# Altium PCB GTV4.0-V16_Lite.PcbDoc (part 5 of 7)
Units mil, origin at the board's own origin, x right, y up, seen from the top; angles counter-clockwise.
Board outline 5582.68 x 4389.76 mil, 4 copper layers (Top Layer, Layer 1, Layer 2, Bottom Layer), stack 62.631 mil thick; 269 components, 191 nets, 849 pads, 375 vias.
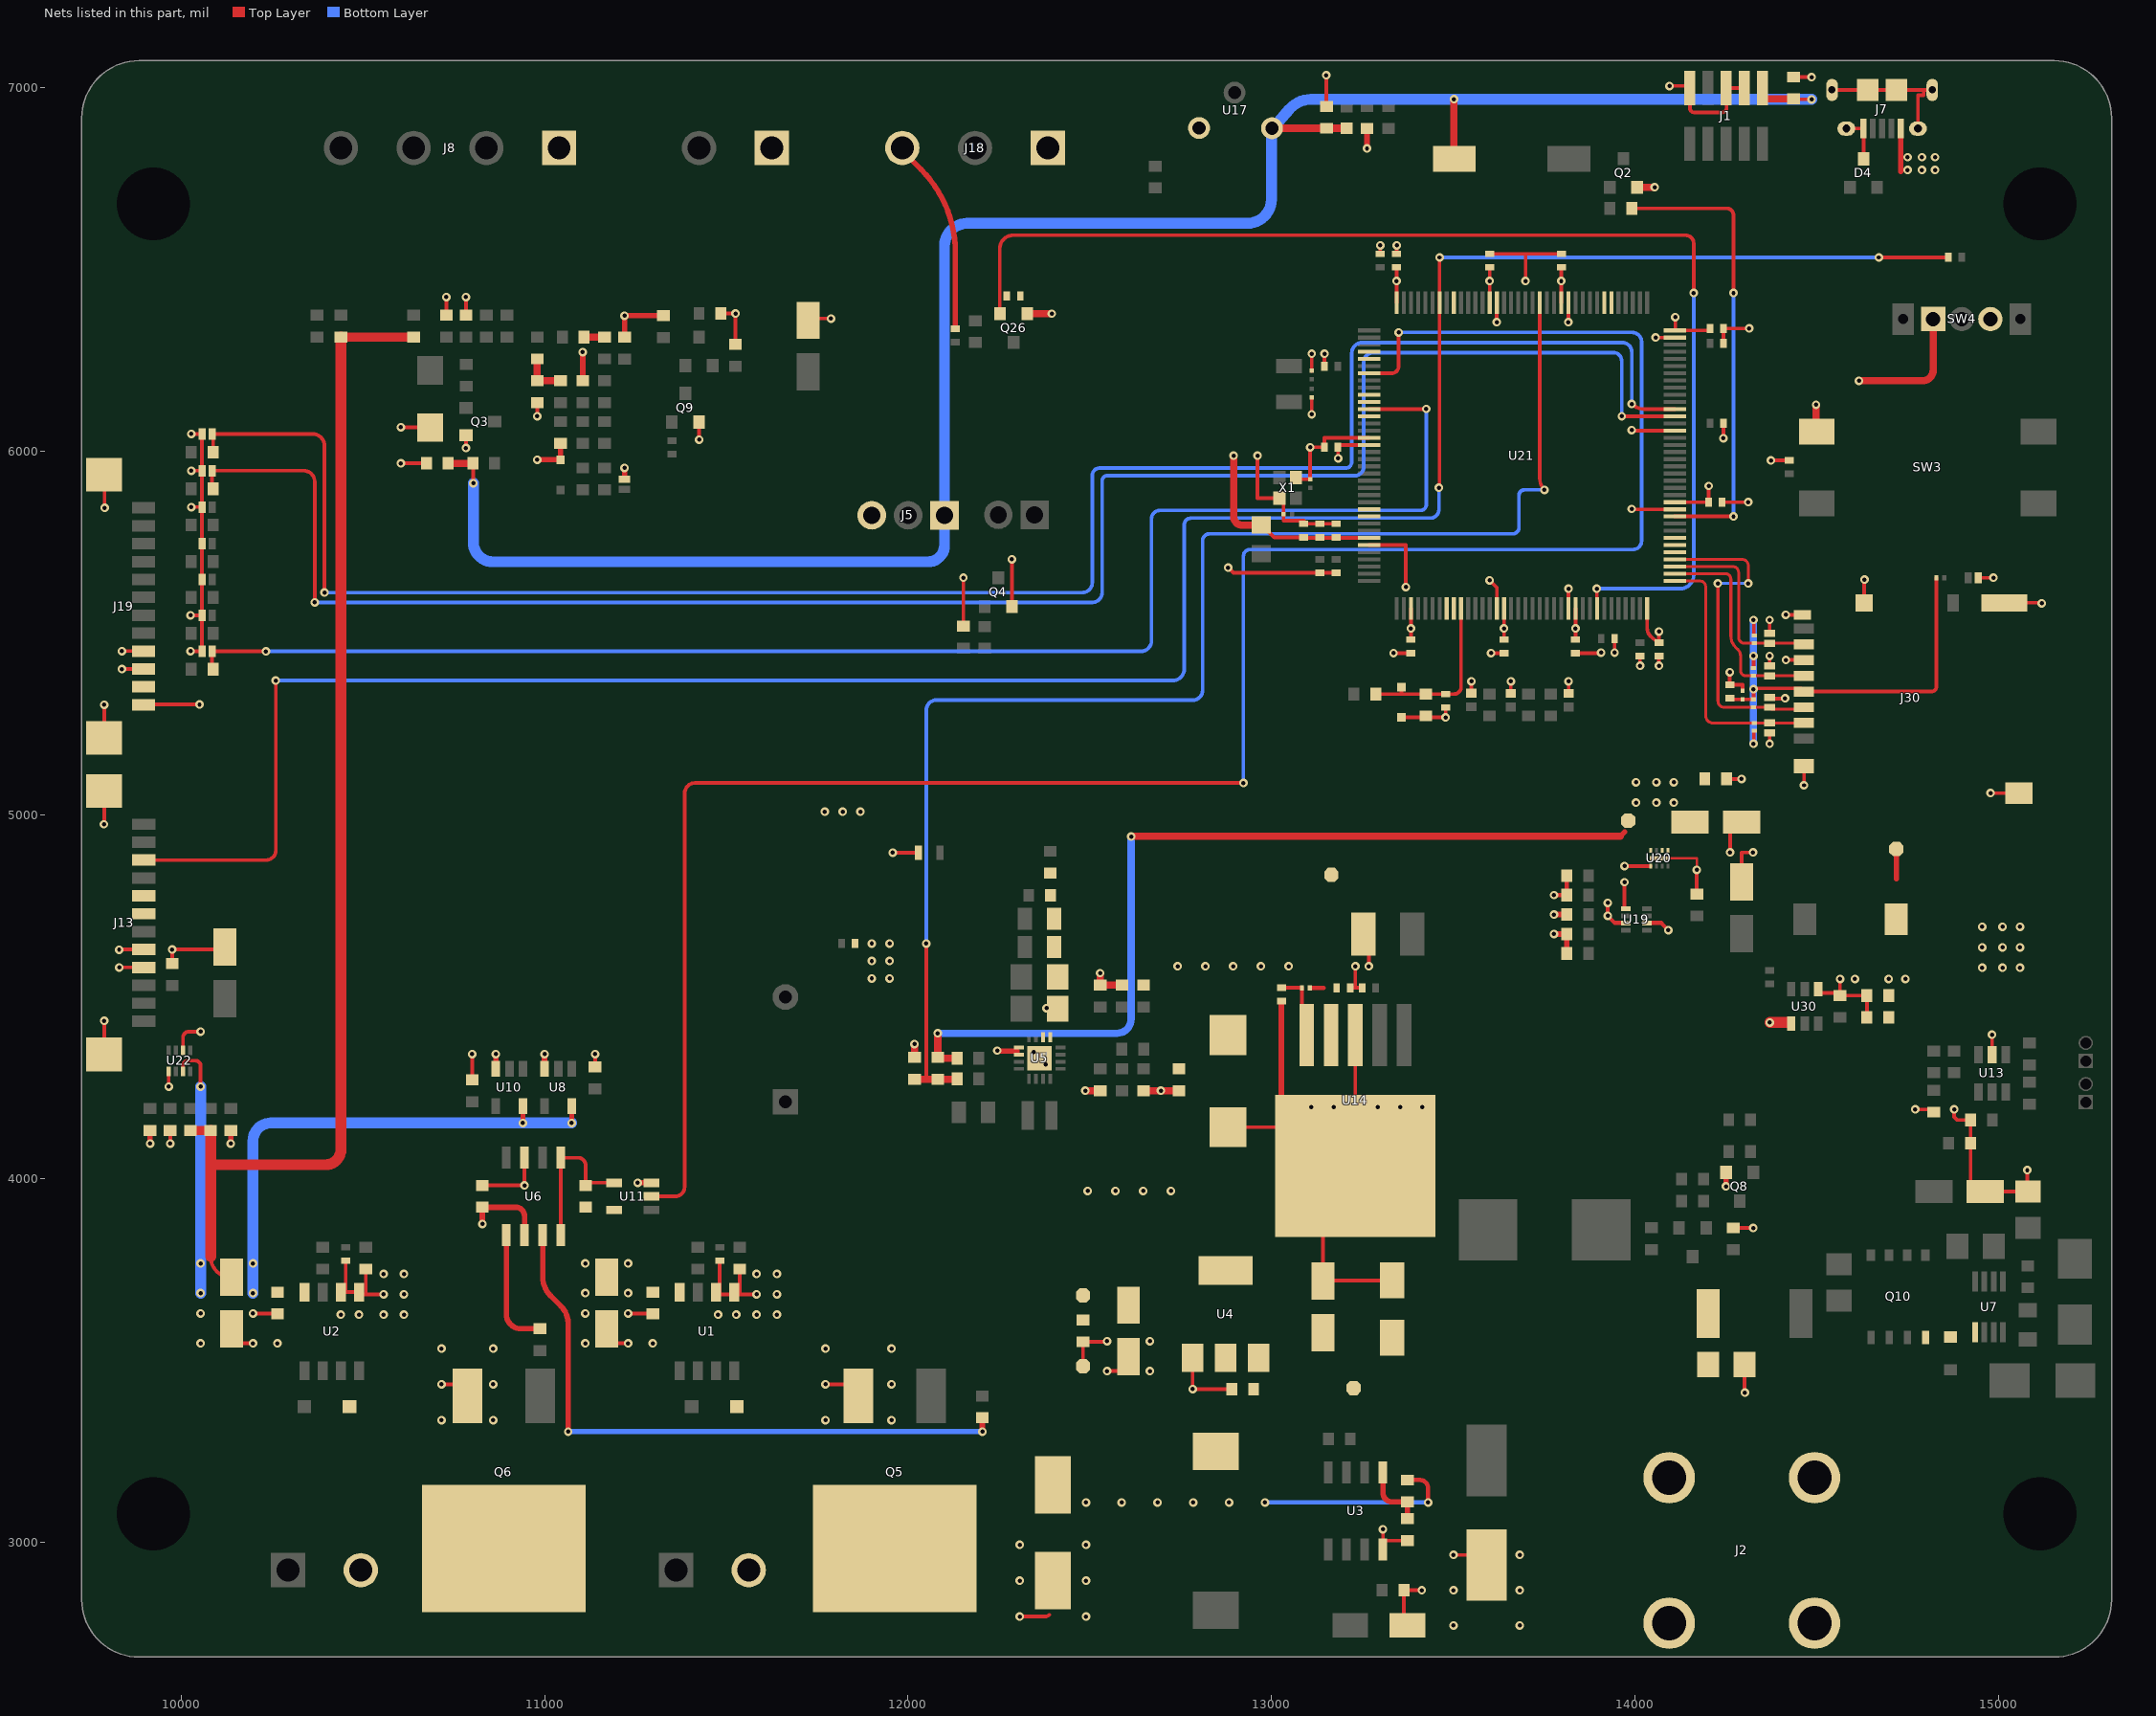
[diagram p4: the nets of this part, all layers, seen from the top]

## Part data (continued)
R65: library part RT0603BRE0763K4L, "RES SMD 63.4KOHM 0.1% 1/10W 0603", Case/Package=0603, LCSC Part Number=C862245, Manufacturer=Yageo, Max Operating Temperature=155°C, Max Power Dissipation=100mW, Min Operating Temperature=-55°C, Temperature Coefficient=50ppm/°C, Tolerance=0.1%, Voltage Rating=75V, Voltage Rating (DC)=50V, ComponentLink1Description=https://datasheet.ciiva.com/2584/pyu-rt-1-to-0-05-rohs-l-5-2584583.pdf?src-supplier=Digikey, ComponentLink1URL=https://datasheet.ciiva.com/2584/pyu-rt-1-to-0-05-rohs-l-5-2584583.pdf?src-supplier=Digikey, Item Type=Resistor, Lead Free="Lead Free", Manufacturer Part Number=RT0603BRE0763K4L, Number of Terminations=2, Packaging="Tape and Reel", Pricing="5000=0.04587 (USD)", RoHS=Yes, RoHS Compliant=Yes, Series=RT, Supplier=Digikey
R66 R67 R97 R98 R99 R100 R101 R102 R103 R129 R130 R134 R135: library part RC0603JR-070RL, "RES 0 OHM JUMPER 1/10W 0603", Case Code (Imperial)=0603, Case Code (Metric)=1608, LCSC Part Number=C95177, Manufacturer=Yageo, Max Operating Temperature=155°C, Max Power Dissipation=100mW, Min Operating Temperature=-55°C, Package Quantity=5000, Resistance=0mR, Resistance Tolerance=5%, Resistor Type="Thick Film", Supplier Part Number 1=311-0.0GRCT-ND, Temperature Coefficient=200ppm/°C, Tolerance=1%, Voltage Rating=50V, Case/Package=0603, Category="Chip SMD Resistors", Construction=Rectangular, Contact Plating=Tin,Matte, Depth=0.8mm, Features="Moisture Resistant", Height=0.45mm, Item Type=Resistor, Lead Free="Lead Free", Length=1.6mm, Manufacturer Part Number=RC0603JR-070RL, Military Standard=Not, Number of Pins=2, Number of Terminations=2, Packaging="Tape and Reel", Power Rating=100mW, Pricing 1="1=0.10000, 10=0.01700, 25=0.01240, 50=0.00960, 100=0.00700, 250=0.00536, 500=0.00430, 1000=0.00316 (USD)", Radiation Hardening=No, Reach SVHC Compliant="No SVHC", RoHS=Yes, RoHS Compliant=Yes, Series=RC, Size Code=0603, Stock 1=18081776, Supplier 1=Digi-Key, Technology="THICK FILM", Termination=SMD/SMT, Voltage Rating (DC)=50V, Width=0.8mm
R69 R131 R132: library part RC0603FR-07470RL, "RES 470 OHM 1% 1/10W 0603", Case Code (Imperial)=0603, Case Code (Metric)=1608, LCSC Part Number=C114669, Manufacturer=Yageo, Max Operating Temperature=155°C, Max Power Dissipation=100mW, Min Operating Temperature=-55°C, Package Quantity=1, Resistance Tolerance=1%, Resistor Type="Thick Film", Supplier Part Number 1=311-470HRCT-ND, Temperature Coefficient=100ppm/°C, Voltage Rating=50V, Working Voltage=75V, Case/Package=0603, Category="Chip SMD Resistors", ComponentLink1Description=https://datasheet.ciiva.com/11808/0900766b80f96399-11808177.pdf?src-supplier=RSComponents, ComponentLink1URL=https://datasheet.ciiva.com/11808/0900766b80f96399-11808177.pdf?src-supplier=RSComponents, ComponentLink2Description=https://datasheet.ciiva.com/7746/1738695-7746359.pdf?src-supplier=Element14, ComponentLink2URL=https://datasheet.ciiva.com/7746/1738695-7746359.pdf?src-supplier=Element14, ComponentLink3Description=https://datasheet.ciiva.com/7746/1738695-7746360.pdf?src-supplier=Element14, ComponentLink3URL=https://datasheet.ciiva.com/7746/1738695-7746360.pdf?src-supplier=Element14, ComponentLink4Description=https://datasheet.ciiva.com/7660/1868787-7660793.pdf?src-supplier=Element14, ComponentLink4URL=https://datasheet.ciiva.com/7660/1868787-7660793.pdf?src-supplier=Element14, ComponentLink5Description=https://datasheet.ciiva.com/46440/1868787-46440907.pdf?src-supplier=Element14, ComponentLink5URL=https://datasheet.ciiva.com/46440/1868787-46440907.pdf?src-supplier=Element14, ComponentLink6Description=https://datasheet.ciiva.com/2454/pyu-r-int-thick-7-2454012.pdf?src-supplier=Digi-Key, ComponentLink6URL=https://datasheet.ciiva.com/2454/pyu-r-int-thick-7-2454012.pdf?src-supplier=Digi-Key, ComponentLink7Description=https://datasheet.ciiva.com/2454/pyu-r-int-thick-7-2454013.pdf?src-supplier=Digi-Key, ComponentLink7URL=https://datasheet.ciiva.com/2454/pyu-r-int-thick-7-2454013.pdf?src-supplier=Digi-Key, ComponentLink8Description=https://datasheet.ciiva.com/2454/pyu-r-int-thick-7-2454014.pdf?src-supplier=Digi-Key, ComponentLink8URL=https://datasheet.ciiva.com/2454/pyu-r-int-thick-7-2454014.pdf?src-supplier=Digi-Key, Construction=Rectangular, Depth=0.8mm, Features="Moisture Resistant", Height=0.022inch, Lead Free="Lead Free", Length=1.6mm, Manufacturer Part Number=RC0603FR-07470RL, Military Standard=Not, Number of Terminations=2, Packaging="Tape and Reel", Power Rating=100mW, Pricing 1="1=0.10000, 10=0.02400, 100=0.00970, 1000=0.00436, 2500=0.00378 (USD)", REACH SVHC="No SVHC", Resistance=470R, RoHS=Yes, RoHS Compliant=Yes, Series=RC, Stock 1=154083, Supplier 1=Digi-Key, Technology="THICK FILM", Termination=SMD/SMT, Tolerance=1%, Width=0.031inch
R73 R74 R105: library part RC0402FR-0710KL, "RES 10K OHM 1% 1/16W 0402", Case Code (Imperial)=0402, Case Code (Metric)=1005, LCSC Part Number=C60490, Manufacturer=Yageo, Max Operating Temperature=155°C, Max Power Dissipation=63mW, Min Operating Temperature=-55°C, Power Rating=62.5mW, Resistance=10kR, Resistance Tolerance=1%, Resistor Type="Thick Film", Supplier Part Number 1=603-RC0402FR-0710KL, Temperature Coefficient=100ppm/°C, Voltage Rating=50V, Case/Package=0402, Category="Chip SMD Resistors", ComponentLink1Description=https://datasheet.ciiva.com/7660/38568-7660787.pdf?src-supplier=Element14, ComponentLink1URL=https://datasheet.ciiva.com/7660/38568-7660787.pdf?src-supplier=Element14, ComponentLink2Description=https://datasheet.ciiva.com/7849/1686128-7849814.pdf?src-supplier=Element14, ComponentLink2URL=https://datasheet.ciiva.com/7849/1686128-7849814.pdf?src-supplier=Element14, ComponentLink3Description=https://datasheet.ciiva.com/7983/1018594-7983486.pdf?src-supplier=Element14, ComponentLink3URL=https://datasheet.ciiva.com/7983/1018594-7983486.pdf?src-supplier=Element14, ComponentLink4Description=https://datasheet.ciiva.com/22747/1018594-22747512.pdf?src-supplier=Element14, ComponentLink4URL=https://datasheet.ciiva.com/22747/1018594-22747512.pdf?src-supplier=Element14, ComponentLink5Description=https://datasheet.ciiva.com/12667/pyu-rc0402-51-rohs-l-6-r-12667067.pdf?src-supplier=Mouser, ComponentLink5URL=https://datasheet.ciiva.com/12667/pyu-rc0402-51-rohs-l-6-r-12667067.pdf?src-supplier=Mouser, ComponentLink6Description=https://datasheet.ciiva.com/7849/1784430-7849813.pdf?src-supplier=Element14, ComponentLink6URL=https://datasheet.ciiva.com/7849/1784430-7849813.pdf?src-supplier=Element14, ComponentLink7Description=https://datasheet.ciiva.com/7849/1784430-7849815.pdf?src-supplier=Element14, ComponentLink7URL=https://datasheet.ciiva.com/7849/1784430-7849815.pdf?src-supplier=Element14, Construction=Rectangular, Depth=0.5mm, Features="Moisture Resistant", Height=0.32mm, Item Type=Resistor, Lead Free="Lead Free", Lead Pitch=0.2mm, Length=1mm, Manufacturer Part Number=RC0402FR-0710KL, Military Standard=Not, Number of Pins=2, Number of Terminations=2, Packaging="Tape and Reel", Pricing 1="1=0.10000, 10=0.01400, 50=0.01400, 100=0.00500, 1000=0.00300, 10000=0.00200 (USD)", REACH SVHC="No SVHC", RoHS=Yes, RoHS Compliant=Yes, Series=RC, Stock 1=18648329, Supplier 1=Mouser, Termination=SMD/SMT, Tolerance=1%, Voltage Rating (DC)=50V, Width=0.5mm, Working Voltage=50V
R109 R136: library part CRCW06031M82FKEA, "RES SMD 1.82M OHM 1% 1/10W 0603", Case Code (Imperial)=0603, Case Code (Metric)=1608, Manufacturer=Vishay, Max Operating Temperature=155°C, Max Power Dissipation=100mW, Min Operating Temperature=-55°C, Package Quantity=10, Resistance Tolerance=1%, Resistor Type="Thick Film", Supplier Part Number=71-CRCW0603-1.82M-E3, Temperature Coefficient=100ppm/°C, Voltage Rating=75V, Case/Package=0603, Category="Chip SMD Resistors", ComponentLink1Description=https://datasheet.ciiva.com/5562/dcrcwe3-109170-5562266.pdf?src-supplier=Mouser, ComponentLink1URL=https://datasheet.ciiva.com/5562/dcrcwe3-109170-5562266.pdf?src-supplier=Mouser, ComponentLink2Description=https://datasheet.ciiva.com/2494/dcrcwe3-2494783.pdf?src-supplier=Digikey, ComponentLink2URL=https://datasheet.ciiva.com/2494/dcrcwe3-2494783.pdf?src-supplier=Digikey, ComponentLink3Description=https://datasheet.ciiva.com/2494/dcrcwe3-2494784.pdf?src-supplier=Digikey, ComponentLink3URL=https://datasheet.ciiva.com/2494/dcrcwe3-2494784.pdf?src-supplier=Digikey, ComponentLink4Description=https://datasheet.ciiva.com/2494/dcrcwe3-2494785.pdf?src-supplier=Digikey, ComponentLink4URL=https://datasheet.ciiva.com/2494/dcrcwe3-2494785.pdf?src-supplier=Digikey, ComponentLink5Description=https://datasheet.ciiva.com/7801/1697337-7801051.pdf?src-supplier=Element14, ComponentLink5URL=https://datasheet.ciiva.com/7801/1697337-7801051.pdf?src-supplier=Element14, ComponentLink6Description=https://datasheet.ciiva.com/7801/1697337-7801052.pdf?src-supplier=Element14, ComponentLink6URL=https://datasheet.ciiva.com/7801/1697337-7801052.pdf?src-supplier=Element14, ComponentLink7Description=https://datasheet.ciiva.com/7792/1700796-7792117.pdf?src-supplier=Element14, ComponentLink7URL=https://datasheet.ciiva.com/7792/1700796-7792117.pdf?src-supplier=Element14, ComponentLink8Description=https://datasheet.ciiva.com/9095/dcrcwe3-9095658.pdf?src-supplier=Avnet, ComponentLink8URL=https://datasheet.ciiva.com/9095/dcrcwe3-9095658.pdf?src-supplier=Avnet, Contact Plating=Tin, Features="Automotive AEC-Q200", Height=0.02inch, Item Type=Resistor, Lead Free=5697LeadFree, Length=0.061inch, Manufacturer Part Number=CRCW06031M82FKEA, Number of Terminations=2, Packaging="Tape and Reel", Power Rating=100mW, Pricing="1=0.1, 10=0.019, 50=0.019, 100=0.009, 1000=0.007, 10000=0.004 (USD)", Radiation Hardening=No, Reach SVHC Compliant=Unknown, RoHS=Yes, RoHS Compliant=Yes, Series=CRCW, Stock=16834, Supplier=Mouser, Termination=SMD/SMT, Tolerance=1%, Voltage Rating (DC)=75V, Weight=7.1E-05oz, Width=0.033inch
R124: library part RC0603FR-07100RL, "RES SMD 100 OHM 1% 1/10W 0603", Case Code (Imperial)=0603, Case Code (Metric)=1608, LCSC Part Number=C105588, Manufacturer=Yageo, Max Operating Temperature=155°C, Max Power Dissipation=100mW, Min Operating Temperature=-55°C, Resistance Tolerance=1%, Resistor Type="Thick Film", Temperature Coefficient=100ppm/°C, Voltage Rating=50V, Case/Package=0603, Category="Chip SMD Resistors", Construction=Rectangular, Depth=0.8mm, Features="Moisture Resistant", Height=0.45mm, Item Type=Resistor, Lead Free="Lead Free", Length=1.6mm, Manufacturer Part Number=RC0603FR-07100RL, Military Standard=Not, Number of Pins=2, Number of Terminations=2, Packaging="Tape and Reel", Power Rating=100mW, Pricing 1="5000=0.00300, 5000=0.00200, 5000=0.00450, 50000=0.00410, 500000=0.00230, 2500000=0.00140 (USD)", REACH SVHC=Unknown, Resistance=100R, RoHS=Yes, RoHS Compliant=Yes, Series=RC, Size Code=0603, Stock 1=3800000, Supplier 1="Arrow Electronics", Supplier Part Number 1=RC0603FR-07100RL, Technology="THICK FILM", Termination=SMD/SMT, Tolerance=1%, Voltage Rating (DC)=50V, Width=0.8mm
R125 R127 R133 R137: library part RT0603BRD0710KL, "RES SMD 10K OHM 0.1% 1/10W 0603", Case/Package=0603, LCSC Part Number=C95204, Manufacturer=Yageo, Max Operating Temperature=155°C, Min Operating Temperature=-55°C, Package Height=0.45mm, Package Length=1.6mm, Package Style=SMTMeter, Package Width=0.8mm, Power=100mW, Rated Temperature=70°C, Resistor Type="FIXED RESISTOR", Supplier Part Number 1=1991391P, Temperature Coefficient=25ppm/°C, Tolerance=0.1%, Working Voltage=75V, Category="Chip SMD Resistors", ComponentLink1Description=https://datasheet.ciiva.com:443/pdfs/VipMasterIC/IC/YAGO/YAGO-S-A0008510989/YAGO-S-A0008510989-1.pdf?src-supplier=IHS+Markit, ComponentLink1URL=https://datasheet.ciiva.com:443/pdfs/VipMasterIC/IC/YAGO/YAGO-S-A0008510989/YAGO-S-A0008510989-1.pdf?src-supplier=IHS+Markit, ComponentLink2Description=https://datasheet.ciiva.com/5624/pyu-rt-1-to-0-05-rohs-l-4-5624351.pdf?src-supplier=Mouser, ComponentLink2URL=https://datasheet.ciiva.com/5624/pyu-rt-1-to-0-05-rohs-l-4-5624351.pdf?src-supplier=Mouser, ComponentLink3Description=https://datasheet.ciiva.com/29721/pyu-rt-1-to-0-05-rohs-l-4-29721177.pdf?src-supplier=Digi-Key, ComponentLink3URL=https://datasheet.ciiva.com/29721/pyu-rt-1-to-0-05-rohs-l-4-29721177.pdf?src-supplier=Digi-Key, Construction=Chip, Item Type=Resistor, Manufacturer Part Number=RT0603BRD0710KL, Mounting Technology="Surface Mount", Packaging="Tape and Reel", Pins=2, Pricing 1="100=0.29800, 250=0.27800, 500=0.25900, 1000=0.23700 (GBP)", Reach SVHC Compliant=Yes, RoHS=Yes, RoHS Compliant=Yes, Stock 1=20510, Supplier 1=Rs, Technology="THIN FILM", Termination=Wraparound
R126 R128: library part RT0603BRD073K3L, "RES SMD 3.3K OHM 0.1% 1/10W 0603", Case Code (Imperial)=0603, Case Code (Metric)=1608, LCSC Part Number=C309653, Manufacturer=Yageo, Max Operating Temperature=125°C, Max Power Dissipation=100mW, Min Operating Temperature=-55°C, Package Quantity=5000, Resistance=3.3kR, Resistor Type="Thin Film", Temperature Coefficient=25ppm/°C, Tolerance=0.1%, Voltage Rating=75V, Voltage Rating (DC)=50V, Case/Package=0603, Category="Chip SMD Resistors", ComponentLink1Description=https://datasheet.ciiva.com/11814/0900766b8027bd26-11814026.pdf?src-supplier=Rs, ComponentLink1URL=https://datasheet.ciiva.com/11814/0900766b8027bd26-11814026.pdf?src-supplier=Rs, ComponentLink2Description=https://datasheet.ciiva.com/12694/pyu-rt-1-to-0-05-rohs-l-4-12694839.pdf?src-supplier=Mouser, ComponentLink2URL=https://datasheet.ciiva.com/12694/pyu-rt-1-to-0-05-rohs-l-4-12694839.pdf?src-supplier=Mouser, ComponentLink3Description=https://datasheet.ciiva.com/2585/pyu-rt-1-to-0-05-rohs-l-4-2585926.pdf?src-supplier=Digi-Key, ComponentLink3URL=https://datasheet.ciiva.com/2585/pyu-rt-1-to-0-05-rohs-l-4-2585926.pdf?src-supplier=Digi-Key, Construction=Rectangular, Contact Plating=Tin,Lead, Depth=0.8mm, Features="Moisture Resistant", Height=0.022inch, Item Type=Resistor, Lead Free="Lead Free", Length=0.063inch, Manufacturer Part Number=RT0603BRD073K3L, Military Standard=Not, Number of Terminations=2, Packaging="Tape and Reel", Power Rating=100mW, Pricing 1="1=0.30610, 10=0.21080, 25=0.17430, 100=0.09180, 250=0.09000, 500=0.07600, 1000=0.04220 (USD)", RoHS=Yes, RoHS Compliant=Yes, Series=RT, Stock 1=2417, Supplier 1="Arrow Electronics", Supplier Part Number 1=RT0603BRD073K3L, Termination=SMD/SMT, Width=0.031inch
R149: library part 25121WJ0000T4E, "1W Thick Film Resistor 200V ±5% ±800ppm/℃ 0Ω 2512 Chip Resistor - Surface Mount ROHS", LCSC Part Number=C25469, Manufacturer="Royal Electronic Factory", Temperature Coefficient=400ppm/°C, ComponentLink1Description=https://datasheet.octopart.com/25121WJ0000T4E-Royal-Ohm-datasheet-165785611.pdf?src-supplier=TME, ComponentLink1URL=https://datasheet.octopart.com/25121WJ0000T4E-Royal-Ohm-datasheet-165785611.pdf?src-supplier=TME, Item Type=Resistor, Manufacturer Part Number=25121WJ0000T4E, Pricing="10000=0.019 (USD)", RoHS=No, Stock=12000, Supplier=Mouser
R156 R157 R158 R159 R160: library part RC0201FR-0710KL, "RES SMD 10K OHM 1% 1/20W 0201", LCSC Part Number=C106225, Manufacturer=Yageo, Package=0201, ComponentLink7Description=LCSC, ComponentLink7URL=https://www.lcsc.com/product-detail/Chip-Resistor-Surface-Mount_YAGEO-RC0201FR-0710KL_C106225.html, Item Type=Resistor, Manufacturer Part Number=RC0201FR-0710KL
R161 R162: library part RC0603FR-071ML, "RES SMD 1M OHM 1% 1/10W 0603", Case Code (Imperial)=0603, Case Code (Metric)=1608, LCSC Part Number=C105578, Manufacturer=Yageo, Max Operating Temperature=155°C, Min Operating Temperature=-55°C, Package Quantity=5000, Power Rating=100mW, Resistance=1MR, Supplier Part Number 1=311-1.00MHRDKR-ND, Temperature Coefficient=100ppm/°C, Tolerance=1%, Voltage Rating=50V, Case/Package=0603, ComponentLink1Description=http://www.farnell.com/datasheets/2167052.pdf?src-supplier=Mouser, ComponentLink1URL=http://www.farnell.com/datasheets/2167052.pdf?src-supplier=Mouser, ComponentLink2Description=http://www.farnell.com/datasheets/2167052.pdf?src-supplier=Element14, ComponentLink2URL=http://www.farnell.com/datasheets/2167052.pdf?src-supplier=Element14, ComponentLink3Description=http://documents.rs-components.com/techlib://itc_doclist_GB.htm?stockno=5048956&src-supplier=RSComponents, ComponentLink3URL=http://documents.rs-components.com/techlib://itc_doclist_GB.htm?stockno=5048956&src-supplier=RSComponents, Composition="Thick Film", Depth=0.8mm, Height=0.45mm, Item Type=Resistor, Lead Free="Lead Free", Length=1.6mm, Manufacturer Part Number=RC0603FR-071ML, Military Standard=Not, Number of Pins=2, Packaging="Tape and Reel", Pricing 1="1=0.1, 10=0.023, 100=0.0094, 1000=0.00421, 2500=0.00366 (USD)", REACH SVHC="No SVHC", Stock 1=3824601, Supplier 1=Digi-Key, Termination=SMD/SMT, Voltage Rating (DC)=50V, Width=0.8mm
R164: library part CRCW0603402KFKEA, "RES SMD 402K OHM 1% 1/10W 0603", Manufacturer=Vishay, Supplier Part Number=71-CRCW0603-402K-E3, Voltage Rating (DC)=75V, Category="Chip SMD Resistors", ComponentLink1Description=https://datasheet.ciiva.com/5541/dcrcwe3-109170-5541596.pdf?src-supplier=Mouser, ComponentLink1URL=https://datasheet.ciiva.com/5541/dcrcwe3-109170-5541596.pdf?src-supplier=Mouser, ComponentLink2Description=https://datasheet.ciiva.com/22705/1697337-22705964.pdf?src-supplier=Element14, ComponentLink2URL=https://datasheet.ciiva.com/22705/1697337-22705964.pdf?src-supplier=Element14, ComponentLink3Description=https://datasheet.ciiva.com/7792/125364-7792268.pdf?src-supplier=Element14, ComponentLink3URL=https://datasheet.ciiva.com/7792/125364-7792268.pdf?src-supplier=Element14, ComponentLink4Description=https://datasheet.ciiva.com/7674/1697337-7674093.pdf?src-supplier=Element14, ComponentLink4URL=https://datasheet.ciiva.com/7674/1697337-7674093.pdf?src-supplier=Element14, ComponentLink5Description=https://datasheet.ciiva.com/7674/1697337-7674094.pdf?src-supplier=Element14, ComponentLink5URL=https://datasheet.ciiva.com/7674/1697337-7674094.pdf?src-supplier=Element14, ComponentLink6Description=https://datasheet.ciiva.com/3257/dcrcwe3-3257561.pdf?src-supplier=Avnet, ComponentLink6URL=https://datasheet.ciiva.com/3257/dcrcwe3-3257561.pdf?src-supplier=Avnet, ComponentLink7Description=https://datasheet.ciiva.com/2466/dcrcwe3-2466643.pdf?src-supplier=Digikey, ComponentLink7URL=https://datasheet.ciiva.com/2466/dcrcwe3-2466643.pdf?src-supplier=Digikey, ComponentLink8Description=https://datasheet.ciiva.com/2466/dcrcwe3-2466641.pdf?src-supplier=Digikey, ComponentLink8URL=https://datasheet.ciiva.com/2466/dcrcwe3-2466641.pdf?src-supplier=Digikey, ComponentLink9Description=https://datasheet.ciiva.com/2466/dcrcwe3-2466642.pdf?src-supplier=Digikey, ComponentLink9URL=https://datasheet.ciiva.com/2466/dcrcwe3-2466642.pdf?src-supplier=Digikey, ComponentLink10Description=https://datasheet.ciiva.com/16769/70201119-16769689.pdf?src-supplier=Allied+Electronics, ComponentLink10URL=https://datasheet.ciiva.com/16769/70201119-16769689.pdf?src-supplier=Allied+Electronics, ComponentLink11Description=https://datasheet.ciiva.com/16427/dcrcwe3-16427337.pdf?src-supplier=Future+Electronics, ComponentLink11URL=https://datasheet.ciiva.com/16427/dcrcwe3-16427337.pdf?src-supplier=Future+Electronics, Item Type=Resistor, Lead Free=5697LeadFree, Manufacturer Part Number=CRCW0603402KFKEA, Pricing="1=0.1, 10=0.019, 50=0.019, 100=0.009, 1000=0.007, 10000=0.004 (USD)", RoHS=Yes, Stock=15471, Supplier=Mouser
R165: library part RC0603FR-07845KL, "RES 845K OHM 1% 1/10W 0603", Manufacturer=Yageo, Supplier Part Number=2538940, Category="Chip SMD Resistors", ComponentLink1Description=https://datasheet.ciiva.com/8884/pyu-rc0603-51-rohs-l-4-8884697.pdf?src-supplier=Avnet, ComponentLink1URL=https://datasheet.ciiva.com/8884/pyu-rc0603-51-rohs-l-4-8884697.pdf?src-supplier=Avnet, ComponentLink2Description=https://datasheet.ciiva.com/2455/pyu-r-int-thick-7-2455278.pdf?src-supplier=Digikey, ComponentLink2URL=https://datasheet.ciiva.com/2455/pyu-r-int-thick-7-2455278.pdf?src-supplier=Digikey, ComponentLink3Description=https://datasheet.ciiva.com/2455/pyu-r-int-thick-7-2455279.pdf?src-supplier=Digikey, ComponentLink3URL=https://datasheet.ciiva.com/2455/pyu-r-int-thick-7-2455279.pdf?src-supplier=Digikey, ComponentLink4Description=https://datasheet.ciiva.com/2455/pyu-r-int-thick-7-2455280.pdf?src-supplier=Digikey, ComponentLink4URL=https://datasheet.ciiva.com/2455/pyu-r-int-thick-7-2455280.pdf?src-supplier=Digikey, Item Type=Resistor, Manufacturer Part Number=RC0603FR-07845KL, Pricing="5000=0.0026, 50000=0.0025, 150000=0.0024, 375000=0.0023, 1000000=0.0021 (USD)", RoHS=Yes, Stock=90000, Supplier="Future Electronics"
R166: library part RC0603FR-07499KL, "RES 499K OHM 1% 1/10W 0603", LCSC Part Number=C131054, Manufacturer=Yageo, Supplier Part Number=1580604, Voltage Rating (DC)=50V, Category="Chip SMD Resistors", ComponentLink1Description=https://datasheet.ciiva.com/15189/getdatasheetpartid-329306-15189746.pdf?src-supplier=Verical, ComponentLink1URL=https://datasheet.ciiva.com/15189/getdatasheetpartid-329306-15189746.pdf?src-supplier=Verical, ComponentLink2Description=https://datasheet.ciiva.com/11819/0900766b80f96399-11819364.pdf?src-supplier=Rs, ComponentLink2URL=https://datasheet.ciiva.com/11819/0900766b80f96399-11819364.pdf?src-supplier=Rs, ComponentLink3Description=https://datasheet.ciiva.com/2454/pyu-r-int-thick-7-2454186.pdf?src-supplier=Digi-Key, ComponentLink3URL=https://datasheet.ciiva.com/2454/pyu-r-int-thick-7-2454186.pdf?src-supplier=Digi-Key, ComponentLink4Description=https://datasheet.ciiva.com/2454/pyu-r-int-thick-7-2454187.pdf?src-supplier=Digi-Key, ComponentLink4URL=https://datasheet.ciiva.com/2454/pyu-r-int-thick-7-2454187.pdf?src-supplier=Digi-Key, ComponentLink5Description=https://datasheet.ciiva.com/2454/pyu-r-int-thick-7-2454188.pdf?src-supplier=Digi-Key, ComponentLink5URL=https://datasheet.ciiva.com/2454/pyu-r-int-thick-7-2454188.pdf?src-supplier=Digi-Key, Item Type=Resistor, Lead Free=5697LeadFree, Manufacturer Part Number=RC0603FR-07499KL, Pricing="5000=0.0015, 50000=0.0014, 200000=0.0014, 625000=0.0013, 2000000=0.0012 (USD)", RoHS=Yes, Stock=750000, Supplier="Future Electronics"
R167: library part CRCW060333K0JNEA, "RES SMD 33K OHM 5% 1/10W 0603", Case Code (Imperial)=0603, Case Code (Metric)=1608, LCSC Part Number=C4342762, Max Operating Temperature=155°C, Max Power Dissipation=100mW, Min Operating Temperature=-55°C, Package Quantity=5000, Ratings=AEC-Q200, Resistance Tolerance=5%, Resistor Type="Thick Film", Supplier Part Number=71-CRCW0603J-33K-E3, Temperature Coefficient=200ppm/°C, Voltage Rating=75V, Case/Package=0603, Category="Chip SMD Resistors", ComponentLink1Description=LCSC, ComponentLink2Description=https://datasheet.ciiva.com/2462/dcrcwe3-2462530.pdf?src-supplier=Digi-Key, ComponentLink2URL=https://datasheet.ciiva.com/2462/dcrcwe3-2462530.pdf?src-supplier=Digi-Key, ComponentLink3Description=https://datasheet.ciiva.com/2462/dcrcwe3-2462531.pdf?src-supplier=Digi-Key, ComponentLink3URL=https://datasheet.ciiva.com/2462/dcrcwe3-2462531.pdf?src-supplier=Digi-Key, ComponentLink4Description=https://datasheet.ciiva.com/2462/dcrcwe3-2462529.pdf?src-supplier=Digi-Key, ComponentLink4URL=https://datasheet.ciiva.com/2462/dcrcwe3-2462529.pdf?src-supplier=Digi-Key, ComponentLink5Description=https://datasheet.ciiva.com/16778/70201119-16778952.pdf?src-supplier=Allied+Electronics, ComponentLink5URL=https://datasheet.ciiva.com/16778/70201119-16778952.pdf?src-supplier=Allied+Electronics, ComponentLink6Description=https://datasheet.ciiva.com/5551/dcrcwe3-109170-5551035.pdf?src-supplier=Mouser, ComponentLink6URL=https://datasheet.ciiva.com/5551/dcrcwe3-109170-5551035.pdf?src-supplier=Mouser, ComponentLink7Description=https://datasheet.ciiva.com/3257/dcrcwe3-3257470.pdf?src-supplier=Avnet, ComponentLink7URL=https://datasheet.ciiva.com/3257/dcrcwe3-3257470.pdf?src-supplier=Avnet, ComponentLink8Description=https://datasheet.ciiva.com/16389/dcrcwe3-16389979.pdf?src-supplier=Future+Electronics, ComponentLink8URL=https://datasheet.ciiva.com/16389/dcrcwe3-16389979.pdf?src-supplier=Future+Electronics, ComponentLink9Description=https://datasheet.ciiva.com/3257/dcrcwe3-3257469.pdf?src-supplier=Avnet, ComponentLink9URL=https://datasheet.ciiva.com/3257/dcrcwe3-3257469.pdf?src-supplier=Avnet, Construction=Rectangular, Contact Plating=Tin, Depth=0.85mm, Features="Automotive AEC-Q200", Height=0.45mm, Item Type=Resistor, Lead Free="Lead Free", Length=1.55mm, Military Standard=Not, Number of Terminations=2, Packaging="Tape and Reel", Pins=2, Power Rating=100mW, Pricing="1=0.1, 10=0.017, 50=0.017, 100=0.008, 1000=0.006, 10000=0.003 (USD)", Radiation Hardening=No, Reach SVHC Compliant=Unknown, RoHS=Yes, RoHS Compliant=Yes, Series=CRCW, Stock=42690, Supplier=Mouser, Technology="THICK FILM", Termination=SMD/SMT, Tolerance=5%, Voltage Rating (DC)=75V, Weight=7.1E-05oz, Width=0.85mm
SB1 SB2 SB3 SB4 SB5 SB6 SB7 SB8 SB9 SB10 SB11 SB13: "Solder Bridge ON", Manufacturer Part Number="Solder Bridge", Item Type="Solder Bridge"
SB12: "Solder Bridge ON", Item Type="Solder Bridge", Manufacturer Part Number="Solder Bridge_1206"
SW3: "SWITCH TACTILE SPST-NO 0.05A 12V", Case/Package=SMD/SMT, Contact Resistance=100mR, Current Rating=50mA, LCSC Part Number=C273516, Manufacturer=E-Switch, Max Operating Temperature=70°C, Max Voltage Rating (DC)=12V, Min Operating Temperature=-25°C, Operating Force=160gf, Package Quantity=1, Supplier Part Number 1=612-TL3300CF160Q, Actuator Length=5mm, Actuator Type=Standard, ComponentLink1Description=http://www.e-switch.com/system/asset/product_line/data_sheet/157/TL3300.pdf?src-supplier=Digi-Key, ComponentLink1URL=http://www.e-switch.com/system/asset/product_line/data_sheet/157/TL3300.pdf?src-supplier=Digi-Key, ComponentLink2Description=http://spec_sheets.e-switch.com/specs/N301102.pdf?src-supplier=Digi-Key, ComponentLink2URL=http://spec_sheets.e-switch.com/specs/N301102.pdf?src-supplier=Digi-Key, Contact Plating=Silver, Electrical Life=200000Cycles, Illumination Type=Non-Illuminated, Item Type="Tactile Switch", Lead Free="Lead Free", Manufacturer Part Number=TL3300CF160Q, Mechanical Life=200000Cycles, Mount="Surface Mount", Orientation=Straight, Packaging="Tape and Reel", Pricing 1="1=0.53, 10=0.513, 50=0.43, 100=0.393, 1000=0.293, 10000=0.274 (USD)", RoHS Compliant=Yes, Series=TL3300, Stock 1=1884, Supplier 1=Mouser, Switch Function=Off-Mom, Switch Travel=0.35mm, Termination="Gull Wing", Throw Configuration=SPST, Voltage Rating (DC)=12V
SW4: library part SS-12D02-G040, "Straight 1A SPDT 8.7mm 8.6mm 24V 4.5mm Black PCPin 10000 Rectangular columnar -25℃~+70℃ Plugin Slide Switches ROHS", LCSC Part Number=C2876023, Manufacturer=G-Switch, Package=Custom, ComponentLink1Description=LCSC, ComponentLink1URL=https://www.lcsc.com/product-detail/Slide-Switches_G-Switch-SS-12D02-G040_C2876023.html, Item Type=Switch, Manufacturer Part Number=SS-12D02-G040
U1 U2: "SENSOR CURRENT HALL 20A DC", LCSC Part Number=C459324, Manufacturer="Allegro MicroSystems, LLC", Package=SOP-8, ComponentLink4Description=LCSC, ComponentLink4URL=https://www.lcsc.com/product-detail/Current-Sensors_Allegro-MicroSystems-span-style-background-color-ff0-LLC-span-ACS723LLCTR-20AU-T_C459324.html, Item Type="Current Sensor", Manufacturer Part Number=ACS723LLCTR-20AU-T
U3: "IC REG BUCK BST ADJ 1.5A 8SOIC", Case/Package=D, LCSC Part Number=C100023, Manufacturer="Texas Instruments", Max Input Voltage=40V, Max Operating Temperature=70°C, Max Output Current=750mA, Min Input Voltage=3V, Min Operating Temperature=0°C, Min Output Voltage=1.55V, Output Current=1.5A, Package Quantity=1, Quiescent Current=4mA, Supplier Part Number 1=296-17765-1-ND, Switching Frequency=100kHz, Category="Power Supply Modules", ComponentLink1Description=https://datasheet.ciiva.com/7408/1862376-7408060.pdf?src-supplier=Newark, ComponentLink1URL=https://datasheet.ciiva.com/7408/1862376-7408060.pdf?src-supplier=Newark, ComponentLink2Description=https://datasheet.ciiva.com/2025/mc33063a-2025162.pdf?src-supplier=Digi-Key, ComponentLink2URL=https://datasheet.ciiva.com/2025/mc33063a-2025162.pdf?src-supplier=Digi-Key, ComponentLink3Description=https://datasheet.ciiva.com/2025/mc33063a-2025161.pdf?src-supplier=Digi-Key, ComponentLink3URL=https://datasheet.ciiva.com/2025/mc33063a-2025161.pdf?src-supplier=Digi-Key, ComponentLink4Description=https://datasheet.ciiva.com/2025/mc33063a-2025163.pdf?src-supplier=Digi-Key, ComponentLink4URL=https://datasheet.ciiva.com/2025/mc33063a-2025163.pdf?src-supplier=Digi-Key, Contact Plating=Gold, Item Type=IC, Lead Free="Lead Free", Manufacturer Part Number=MC34063ADR, Max Output Voltage=40V, Number of Outputs=1, Number of Pins=8, Output Type=Adjustable, Output Voltage=40V, Packaging="Tape and Reel", Pricing 1="1=0.78000, 10=0.68400, 25=0.64240, 100=0.52420, 250=0.48688, 500=0.41438, 1000=0.34206 (USD)", Radiation Hardening=No, REACH SVHC="No SVHC", RoHS=Yes, RoHS Compliant=Yes, Stock 1=17204, Supplier 1=Digi-Key, Synchronous Rectifier=No, Termination=SMD/SMT, Topology=Flyback,SEPIC, Weight=0.002561oz
U4: "IC REG LINEAR 3.3V 1A SOT223", Case/Package=SOT-223, Current Rating=1A, Dropout Voltage=1.2V, LCSC Part Number=C201952, Manufacturer="Texas Instruments", Max Input Voltage=15V, Max Operating Temperature=125°C, Min Input Voltage=2.5V, Min Operating Temperature=0°C, Nominal Output Voltage=3.3V, Nominal Supply Current=5mA, Output Voltage Accuracy=1%, Package Quantity=1000, Quiescent Current=10mA, Accuracy=1%, Category="Voltage Regulators - Linear", ComponentLink11Description=LCSC, ComponentLink11URL=https://www.lcsc.com/product-detail/Linear-Voltage-Regulators-LDO_Texas-Instruments-LMS8117AMP-3-3-NOPB_C201952.html, Contact Plating=Tin,Matte, Height=1.6mm, Item Type=IC, Lead Free="Lead Free", Length=6.5mm, Manufacturer Part Number=LMS8117AMP-3.3/NOPB, Max Output Current=1A, Mount="Surface Mount", Number of Outputs=1, Number of Pins=4, Output Current=1A, Output Type=Fixed, Output Voltage=3.3V, Packaging="Tape and Reel", Polarity=Positive, Pricing 1="1=1.18760, 10=1.01800, 100=0.77540, 250=0.68460, 500=0.64870, 1000=0.59270 (USD)", Radiation Hardening=No, REACH SVHC="No SVHC", RoHS=Yes, RoHS Compliant=Yes, Stock 1=843, Supplier 1="Arrow Electronics", Supplier Part Number 1=LMS8117AMP-3.3/NOPB, Width=3.56mm
U5: "IC REG BUCK-BOOST ADJ 3A 16TQFN", Manufacturer="Analog Devices", Supplier Part Number=700-MAX38889AATE+, Category="Voltage Regulators - Switching", Item Type=IC, Manufacturer Part Number=MAX38889AATE+, Pricing="1=6.25, 10=5.65, 50=4.68, 100=4.47, 1000=3.7, 10000=3.7 (USD)", RoHS=No, Stock=2896, Supplier=Mouser
U6: "IC GATE DRVR LOW-SIDE 8SOIC", Case/Package=SOIC, Manufacturer="ON Semiconductor", Max Operating Temperature=140°C, Max Output Current=5A, Max Supply Current=3mA, Max Supply Voltage=20V, Min Operating Temperature=-40°C, Min Supply Voltage=4.5V, Supplier Part Number 1=NCP81071ADR2GOSDKR-ND, Channel Type=Independent, ComponentLink1Description=https://datasheet.ciiva.com/48511/ncp81071-d-48511319.pdf?src-supplier=Avnet, ComponentLink1URL=https://datasheet.ciiva.com/48511/ncp81071-d-48511319.pdf?src-supplier=Avnet, Height=1.5mm, Item Type=IC, Lead Free="Lead Free", Length=5mm, Manufacturer Part Number=NCP81071ADR2G, Mount="Surface Mount", Number of Drivers=2, Number of Outputs=2, Number of Pins=8, Packaging="Cut Tape", Pricing 1="1=1.40000, 10=1.25100, 25=1.18720, 100=0.97520, 250=0.91160, 500=0.80560, 1000=0.70000 (USD)", REACH SVHC="No SVHC", RoHS=Yes, RoHS Compliant=Yes, Supplier 1=Digi-Key, Width=4mm
U7: "IC OR CTRLR N+1 8MSOP", Case/Package=MSOP, Manufacturer="Analog Devices / Linear Technology", Max Operating Temperature=70°C, Max Output Current=180mA, Max Supply Voltage=80V, Min Operating Temperature=0°C, Min Supply Voltage=4V, Operating Supply Current=150uA, Package Quantity=50, Supplier Part Number 1=584-LTC4359CMS8#PBF, ComponentLink1Description=https://datasheet.ciiva.com/6609/4359fb-6609306.pdf?src-supplier=Digi-Key, ComponentLink1URL=https://datasheet.ciiva.com/6609/4359fb-6609306.pdf?src-supplier=Digi-Key, Item Type=IC, Lead Free="Lead Free", Manufacturer Part Number=LTC4359CMS8#PBF, Number of Drivers=1, Number of Pins=8, Packaging=Rail/Tube, Pricing 1="1=4.95000, 10=4.44000, 50=4.19000, 100=3.63000, 1000=3.09000, 10000=3.09000 (USD)", RoHS=Yes, Stock 1=57, Supplier 1=Mouser, Turn-Off Delay Time=300ns, Turn-On Delay Time=200us
U8 U10 U11: "IC BUF NON-INVERT 5.5V SOT23-5", Case/Package=SOT-23-5, High Level Output Current=-8mA, LCSC Part Number=C100024, Low Level Output Current=8mA, Manufacturer="Texas Instruments", Max Operating Temperature=125°C, Max Supply Voltage=5.5V, Min Operating Temperature=-40°C, Min Supply Voltage=1.6V, Package Quantity=3000, Quiescent Current=1uA, Supplier Part Number 1=296-37176-6-ND, ComponentLink1Description=http://www.ti.com/lit/pdf/sdyu001?src-supplier=Digi-Key, ComponentLink1URL=http://www.ti.com/lit/pdf/sdyu001?src-supplier=Digi-Key, ComponentLink2Description=http://www.ti.com/lit/ds/symlink/sn74lv1t34.pdf?src-supplier=Avnet, ComponentLink2URL=http://www.ti.com/lit/ds/symlink/sn74lv1t34.pdf?src-supplier=Avnet, Item Type=IC, Lead Free="Lead Free", Logic Function=Buffer,Inverting, Manufacturer Part Number=SN74LV1T34DBVR, Mount="Surface Mount", Number of Bits=1, Number of Bits per Element=1, Number of Channels=1, Number of Elements=1, Number of Input Lines=1, Number of Inputs=1, Number of Output Lines=1, Number of Outputs=1, Number of Pins=5, Operating Supply Current=8mA, Packaging="Tape and Reel", Polarity=Non-Inverting, Pricing 1="1=0.43, 10=0.349, 25=0.3192, 100=0.2374, 250=0.2152, 500=0.17808, 1000=0.13356 (USD)", Propagation Delay=15.5ns, Radiation Hardening=No, REACH SVHC="No SVHC", RoHS Compliant=Yes, Stock 1=37360, Supplier 1=Digi-Key, Weight=0.000353oz
U13: "IC COMPARATOR 2 WINDW SOT23-THIN", Case/Package=SOT, LCSC Part Number=C33002, Manufacturer="Texas Instruments", Max Operating Temperature=125°C, Max Supply Voltage=18V, Min Operating Temperature=-40°C, Min Supply Voltage=1.8V, Nominal Supply Current=7uA, Number of Voltages Monitored=2, Operating Supply Current=5.5uA, Package Quantity=3000, Quiescent Current=11uA, Supplier Part Number 1=595-TPS3700DDCR, Undervoltage Threshold=1.7V, ComponentLink1Description=https://datasheet.ciiva.com/15106/getdatasheetpartid-496993-15106246.pdf?src-supplier=Verical, ComponentLink1URL=https://datasheet.ciiva.com/15106/getdatasheetpartid-496993-15106246.pdf?src-supplier=Verical, ComponentLink2Description=https://datasheet.ciiva.com/22693/1882693-22693543.pdf?src-supplier=Element14, ComponentLink2URL=https://datasheet.ciiva.com/22693/1882693-22693543.pdf?src-supplier=Element14, ComponentLink3Description=https://datasheet.ciiva.com/6625/tps3700-6625126.pdf?src-supplier=Digi-Key, ComponentLink3URL=https://datasheet.ciiva.com/6625/tps3700-6625126.pdf?src-supplier=Digi-Key, ComponentLink4Description=https://datasheet.ciiva.com/6625/tps3700-6625125.pdf?src-supplier=Digi-Key, ComponentLink4URL=https://datasheet.ciiva.com/6625/tps3700-6625125.pdf?src-supplier=Digi-Key, ComponentLink5Description=https://datasheet.ciiva.com/6625/tps3700-6625129.pdf?src-supplier=Digi-Key, ComponentLink5URL=https://datasheet.ciiva.com/6625/tps3700-6625129.pdf?src-supplier=Digi-Key, ComponentLink6Description=https://datasheet.ciiva.com/14204/tps3700-14204199.pdf?src-supplier=Avnet, ComponentLink6URL=https://datasheet.ciiva.com/14204/tps3700-14204199.pdf?src-supplier=Avnet, Hysteresis=5.5mV, Item Type=IC, Lead Free="Lead Free", Manufacturer Part Number=TPS3700DDCR, Number of Channels=1, Number of Elements=2, Number of Pins=6, Packaging="Tape and Reel", Pricing 1="1=2.75000, 10=2.48000, 25=2.34000, 50=2.34000, 100=2.00000, 250=1.87000, 500=1.64000, 1000=1.36000, 3000=1.35000, 10000=1.35000 (USD)", Propagation Delay=29us, Radiation Hardening=No, REACH SVHC="No SVHC", RoHS=Yes, RoHS Compliant=Yes, Series=TPS3700, Supplier 1=Mouser, Supply Current=7uA, Watchdog Timer=No
U14: "IC REG LDO ADJ 3A TO263-5", Case/Package=TO-263, Dropout Voltage=370mV, Input Bias Current=40nA, LCSC Part Number=C11149, Manufacturer=Microchip, Max Input Voltage=26V, Max Operating Temperature=125°C, Max Output Current=3A, Max Output Voltage=25V, Min Input Voltage=2.5V, Min Operating Temperature=-40°C, Min Output Voltage=1.25V, Package Quantity=750, Quiescent Current=35mA, Reference Voltage=1.24V, Supplier Part Number 1=3153683, Accuracy=1%, Category="Voltage Regulators - Linear", ComponentLink1Description=https://datasheet.ciiva.com/23772/1572633-23772885.pdf?src-supplier=Newark, ComponentLink1URL=https://datasheet.ciiva.com/23772/1572633-23772885.pdf?src-supplier=Newark, ComponentLink2Description=https://datasheet.ciiva.com/16296/mic29150-16296190.pdf?src-supplier=Future+Electronics, ComponentLink2URL=https://datasheet.ciiva.com/16296/mic29150-16296190.pdf?src-supplier=Future+Electronics, ComponentLink3Description=https://datasheet.ciiva.com/15200/getdatasheetpartid-143209-15200663.pdf?src-supplier=Verical, ComponentLink3URL=https://datasheet.ciiva.com/15200/getdatasheetpartid-143209-15200663.pdf?src-supplier=Verical, Height=4.59mm, Item Type=IC, Lead Free="Lead Free", Length=10.67mm, Manufacturer Part Number=MIC29302WU-TR, Mount="Surface Mount", Number of Outputs=1, Number of Pins=5, Number of Regulators=1, Output Configuration=Positive, Output Current=3A, Output Type=Adjustable, Output Voltage=26V, Packaging="Tape and Reel", Polarity=Positive, Pricing 1="750=2.12000, 1500=2.09000, 2250=2.07000, 3000=2.06000, 3750=2.02000 (USD)", Radiation Hardening=No, Reach SVHC Compliant=Yes, RoHS=Yes, RoHS Compliant=Yes, Series=-, Supplier 1="Future Electronics", Width=9.17mm
U17: "Plugin Human Body Sensing Sensor ROHS", LCSC Part Number=C90465, Manufacturer="Senba Sensing Tech", Package=Plugin, ComponentLink1Description=LCSC, ComponentLink1URL=https://lcsc.com/product-detail/Biometric-Sensors_Senba-Sensing-Tech-AS312_C90465.html, Item Type=Sensor, Manufacturer Part Number=AS312
U19 U22: "1.6-V TO 5.5-V, 20-M, 4-A LOW IQ", Manufacturer="Texas Instruments", Supplier Part Number=595-TPS2117DRLR, Height=600um, Item Type=IC, Length=2.1mm, Manufacturer Part Number=TPS2117DRLR, Pins=8, Pricing="1=1.34, 10=1.2, 50=1.2, 100=0.938, 1000=0.612, 10000=0.522 (USD)", RoHS=No, Stock=3415, Supplier=Mouser, Thickness=550um, Width=1.2mm
U20: "IC REG LINEAR 3.3V 1A 8DFN", Case/Package=DFN, LCSC Part Number=C2969937, Manufacturer=STMicroelectronics, Max Operating Temperature=85°C, Max Supply Voltage=5.5V, Min Operating Temperature=-40°C, Min Output Voltage=3.3V, Output Current=1A, Power Supply Rejection Ratio (PSRR)=55dB, Quiescent Current=155uA, ComponentLink1Description=https://www.st.com/resource/en/datasheet/ld56100.pdf?src-supplier=Digikey, ComponentLink1URL=https://www.st.com/resource/en/datasheet/ld56100.pdf?src-supplier=Digikey, Item Type=IC, Manufacturer Part Number=LD56100DPU33R, Mounting Technology="Surface Mount", Number of Regulators=1, Output Configuration=Positive, Output Type=Fixed, Packaging="Cut Tape", Pricing="1=1.23, 10=0.751, 50=0.751, 100=0.479, 1000=0.326, 10000=0.229 (USD)", RoHS=Yes, RoHS Compliant=Yes, Series=-, Supplier=Mouser
U21: "IC MCU 32BIT 1MB FLASH 144LQFP", Frequency=550MHz, LCSC Part Number=C730146, Manufacturer=STMicroelectronics, Max Operating Temperature=85°C, Max Supply Voltage=3.6V, Min Operating Temperature=-40°C, Min Supply Voltage=1.62V, Nominal Supply Current=4uA, Data Bus Width=32b, Density=1MB, Height=1.6mm, Interface=39,40,224,1514,1515,1518,1532,1533Interface, Item Type=IC, Manufacturer Part Number=STM32H723ZGT6, Memory Format=4498,11064MemoryType, Memory Size=1MB, Number of A/D Converters=1NUMBER, Number of ADC Channels=16NUMBER, Number of Ethernet Channels=1NUMBER, Number of I2C Channels=5NUMBER, Number of I/Os=112NUMBER, Number of SPI Channels=6NUMBER, Number of Timers/Counters=4NUMBER, Number of UART Channels=6NUMBER, Number of USB Channels=1NUMBER, Pricing="60=7.31, 120=7.27, 180=7.25, 240=7.23, 300=7.18 (USD)", RAM Size=564KB, RoHS=No, Stock=4380, Supplier="Future Electronics"
U30: "IC REG BUCK 5V 2A TSOT26", LCSC Part Number=C2071056, Manufacturer=Diodes, Supplier Part Number 1=AP63205WU-7DICT-ND, Category="Voltage Regulators - Switching", Item Type=IC, Manufacturer Part Number=AP63205WU-7, Pricing 1="1=0.88, 10=0.776, 25=0.7292, 100=0.5952, 250=0.55284, 500=0.4705, 1000=0.3764 (USD)", RoHS=Yes, Stock 1=88525, Supplier 1=Digi-Key
X1: library part Q22FA12800090, "CRYSTAL 25.0000MHZ 12PF SMD", LCSC Part Number=C255883, Manufacturer="Seiko Epson", Package=SMD2016-4P, ComponentLink1Description=LCSC, ComponentLink1URL=https://www.lcsc.com/product-detail/Crystals_Seiko-Epson-Q22FA12800090_C255883.html, Item Type=Crystal, Manufacturer Part Number=Q22FA12800090
X3: library part NX3215SA-32.768K-STD-MUA-8, "CRYSTAL 32.7680KHZ 12.5PF SMD", Case/Package=SMD/SMT, ESR (Equivalent Series Resistance)=70kR, Frequency=32.768kHz, Frequency Tolerance=20ppm, LCSC Part Number=C156245, Load Capacitance=12.5pF, Manufacturer=NDK, Max Operating Temperature=85°C, Min Operating Temperature=-40°C, Package Quantity=1000, Supplier Part Number 1=644-1156-6-ND, ComponentLink1Description=https://media.digikey.com/pdf/Data%20Sheets/NDK%20PDFs/NX3215SA-32.768K-STD-MUA-8.pdf?src-supplier=Digi-Key, ComponentLink1URL=https://media.digikey.com/pdf/Data%20Sheets/NDK%20PDFs/NX3215SA-32.768K-STD-MUA-8.pdf?src-supplier=Digi-Key, ComponentLink2Description=http://www.ndk.com/images/products/catalog/c_NX3215SA-STD-MUA-14_e.pdf?src-supplier=Digi-Key, ComponentLink2URL=http://www.ndk.com/images/products/catalog/c_NX3215SA-STD-MUA-14_e.pdf?src-supplier=Digi-Key, Height=0.035inch, Lead Free="Lead Free", Length=0.126inch, Manufacturer Part Number=NX3215SA-32.768K-STD-MUA-8, Mount="Surface Mount", Number of Pins=2, Packaging="Tape and Reel", Pricing 1="1=0.68, 10=0.602, 50=0.5628, 100=0.4974, 500=0.47124, 1000=0.3927 (USD)", Stock 1=29951, Supplier 1=Digi-Key, Width=0.059inch

## Free pads (board coordinates)
  round 0 hole 200.79 unplated: MH2(9924,3079) MH2(9924,6681.36) MH2(15112.98,3079) MH2(15112.98,6681.36)

## Via types
v1: diameter 23.62, hole 11.81, Top Layer to Bottom Layer, tented both sides, 375 vias

## Nets (pads, with @x,y where several pads share a name; then routed paths per layer and width w, separated by ;. In a path a pad name is that pad's centre, name@x,y a point inside that pad or via, vN(x,y) a via of type N, cw(c..) or ccw(c..) an arc to the next point about the centre after c; other vN are vias at no path point)
0-10V: R27.2 SB6.2 | length 56.2
  Top Layer w20: SB6.2@11108.94,6315.12 11108.94,6315 R27.2@11165,6315
3V3: C13.1 C14.1 C23.1 C26.1 C28.2 C107.2 C108.2 J1.1 J5.1 J30.4 LED4.1 LS1.1 P1.1 R20.1 R156.2 R157.2 R158.2 R159.2 R160.2 U4.2 U4.4 U17.1 | length 7032
  Top Layer w10: R20.1@10802.69,5968 cw(c10802.69,5966.69) 10804,5966.69 v1(10804,5913) ; C107.2@14259.84,5325.36 ccw(c14266.53,5325.36) C107.2@14266.53,5318.67 ; C107.2@14268.07,5318.67 C108.2@14295,5318.67 R157.2@14318.42,5318.67 ; v1(14325.11,5196.62) 14325.95,5197.47 14325.95,5231.74 14326.27,5232.06 R156.2@14326.8,5232.06 ; R157.2@14325.11,5318.67 v1(14325.11,5346.48) 14327.44,5348.8 14455.55,5348.8 J30.4@14464.03,5340.33 14814.33,5340.33 ccw(c14814.33,5354) 14828,5354 R160.2@14828,5653 ; R158.2@14325.11,5405.29 v1(14325.11,5438.04) ; v1(14325.11,5537.18) 14325.95,5536.33 14325.95,5494.77 14326.27,5494.46 R159.2@14326.8,5494.46 ; J1.1@14350,7000 J1.1@14359.96,6970 ; C14.1@14435,6970 ccw(c14436.17,6970) 14436.17,6968.83 v1(14485,6968.83)
  Top Layer w20: C28.2@10735,5968 R20.1@10802.69,5968 ; U17.1@13003,6887.2 ccw(c13000.8,6887.2) U17.1@13000.8,6889.4 C13.1@13150.5,6889.4 LED4.1@13206,6889.4 ; v1(13501,6969) 13501,6806.71 LS1.1@13502.1,6805.61 ; J1.1@14359.96,6970 C14.1@14435,6970
  Bottom Layer w10: v1@14325.11,5439.73 v1@14326.8,5438.04
  Bottom Layer w20: v1(14325.11,5196.62) v1(14325.11,5438.04) ; v1@14325.11,5439.73 v1(14325.11,5537.18)
  Bottom Layer w30: v1(10804,5913) 10804,5750.93 ccw(c10857.93,5750.93) 10857.93,5697 12054.54,5697 ccw(c12054.54,5742.46) 12100,5742.46 12100,6565 cw(c12163,6565) 12163,6628 12933.71,6628 ccw(c12933.71,6693.29) 12999,6693.29 12999,6887.6 cw(c13000.8,6887.6) U17.1@13000.8,6889.4 13018.37,6906.97 13048.82,6941.73 cw(c13108.57,6889.4) 13108.57,6968.83 13500.83,6968.83 v1(13501,6969) ; v1@13501.17,6968.83 v1(14485,6968.83)
  other v1: 12493.67,3967 12570,3967 12646.33,3967 12722.67,3967
3V3_MCU: C12.1 C29.1 C30.1 C31.1 C32.1 C33.1 C65.1 C66.2 C93.1 C95.1 C109.1 C110.1 C111.1 C112.1 C114.1 L1.1 LED1.1 LED2.1 LED3.1 P11.1 Q26.1 R31.1 R55.1 R73.1 R104.1 R105.2 R161.2 R162.2 SW4.1 U20.1 U20.2 U20.4 U21.17 U21.30 U21.39 U21.52 U21.62 U21.72 U21.84 U21.108 U21.121 U21.131 U21.144 | length 4858.2
  Top Layer w10: L1.1@12971.42,5797.86 12973.78,5797.86 13007.14,5764.5 C114.1@13088,5764.5 ; C114.1@13088,5763.11 C29.1@13177,5763.11 ; R55.1@13145,6235.21 v1(13145,6268.92) ; C29.1@13178.88,5762.62 U21.30@13267.53,5762.62 ; C12.1@13182,6012.53 C12.1@13182.46,6012.07 ; C12.1@13182,6018.53 U21.17@13267.53,6018.53 ; C12.1@13182.46,6018.07 C12.1@13182.46,6012.07 ; v1(13182.91,5981.46) 13182.46,5981.91 C12.1@13182.46,6012.07 ; R105.2@13298.24,6544 v1(13298.24,6567.37) ; U21.144@13343.51,6409.47 v1(13343.51,6468.99) C111.1@13343.51,6507 ; C30.1@13382.88,5483 v1(13382.88,5514.01) U21.39@13382.88,5568.53 ; LED3.1@13549,5335.7 v1(13549,5368.28) ; U21.131@13599.42,6409.47 v1(13599.42,6468.99) C110.1@13599.42,6507 ; C31.1@13638.79,5483 v1(13638.79,5514.01) U21.52@13638.79,5568.53 ; LED2.1@13657.5,5335 v1(13657.5,5368.28) ; U21.121@13796.27,6409.47 v1(13796.27,6468.99) C109.1@13796.27,6507 ; LED1.1@13816.5,5335 v1(13816.5,5368.28) ; C32.1@13835.64,5483 v1(13835.64,5514.01) U21.62@13835.64,5568.53 ; v1(13943.02,5447.04) R31.1@13943.02,5486.09 ; U21.72@14032.49,5568.53 14032.49,5515.06 ccw(c14065,5515.06) 14044.24,5490.03 14057.5,5479.04 C33.1@14065,5475.04 v1(14065,5505) ; U21.84@14108.47,5861.05 C93.1@14201.5,5861.05 ; U21.108@14108.47,6333.49 U21.108@14109.49,6333.49 ; v1(14110,6370) 14110,6334 U21.108@14109.49,6333.49 ; v1(14201.78,5905.66) 14201.64,5905.52 14201.64,5861.19 C93.1@14201.5,5861.05 ; C93.1@14205,5861.05 C93.1@14201.5,5861.05 ; C95.1@14205.5,6338 14205.5,6337.49 14201.5,6333.49 U21.108@14109.49,6333.49 ; v1(14242.25,6037.1) 14242.5,6037.1 R104.1@14242.5,6077.58
  Top Layer w12: C29.1@13177,5764.5 C29.1@13178.88,5762.62
  Top Layer w15: 13958.52,4942 13970.36,4953.84
  Top Layer w20: v1(12081.49,4400.66) R162.2@12081.49,4334.01 12083.49,4332.01 R161.2@12134.49,4332.01 ; Q26.1@12327.4,6379.37 v1(12395,6379.37) ; v1(12613.32,4941.33) 12613.99,4942 13958.52,4942 ; v1(12895,5989) 12895,5821.85 ccw(c12918.99,5821.85) 12918.99,5797.86 L1.1@12971.42,5797.86 ; v1(14615,6195) 14790,6195 ccw(c14790,6224.03) 14819.03,6224.03 SW4.1@14819.03,6364.45
  Bottom Layer w20: v1(12081.49,4400.66) 12574.63,4400.66 ccw(c12574.63,4439.35) 12613.32,4439.35 v1(12613.32,4941.33)
  other v1: 14001.81,5035 14057.81,5035 14105.65,5035 14001.81,5091 14057.81,5091 14105.65,5091
4-20mA: R21.2 R23.2 SB2.2 | length 124
  Top Layer w20: SB2.2@10980,6255 R21.2@10980,6195 R23.2@11044,6195
5V: C4.1 C6.1 C16.1 C17.1 C18.1 C21.1 C22.1 C38.1 D2.1 J7.1 L2.2 P7.1 R1.2 R35.1 R48.1 R125.2 R127.2 R130.1 R135.1 SB8.2 U1.8 U2.8 U4.3 U6.6 U8.5 U10.5 U11.5 U19.3 U22.3 | length 6516.8
  Top Layer w10: U22.3@10005.7,4296.11 10005.7,4311.66 cw(c10019.09,4311.66) 10019.09,4325.05 10040.78,4325.05 cw(c10040.78,4311.82) 10054,4311.82 v1(10054,4254) ; 10081.5,3786.18 ccw(c10138.28,3786.18) 10112.5,3735.59 C16.1@10138.28,3729.4 ; 10081.5,4037.03 cw(c10083.47,4037.03) 10083.47,4039 ; v1(13924,4723.3) v1(13924,4759.28)
  Top Layer w12: v1(10940.62,4153.93) 10940.71,4154.02 10940.71,4199.91 U10.5@10940.8,4200 ; v1@11074.86,4154.11 U8.5@11074.86,4199.99 ; R1.2@13373.48,3171.84 13408.16,3171.84 cw(c13408.16,3150) 13430,3150 v1(13430,3110) ; v1(13924,4723.3) 13943.68,4703.61 U19.3@13974.32,4703.61
  Top Layer w15: v1(10829,3876.21) C38.1@10829,3922 10920.37,3922 cw(c10920.37,3897.37) 10934.36,3917.64 cw(c10920.37,3897.37) 10940.64,3911.36 cw(c10920.37,3897.37) 10945,3897.37 U6.6@10945,3845.7 ; v1(13776,4673.5) R125.2@13811.25,4673.5 R130.1@13811.25,4620 ; 14730,6770 J7.1@14730,6888.43
  Top Layer w25: R127.2@10026,4133.19 R135.1@10081.5,4133.19 ; SB8.2@10440,6315 R35.1@10640,6315
  Top Layer w30: 10081.5,3786.18 10081.5,4037.03 R135.1@10081.5,4133.19 ; 10083.47,4039 10398,4039 ccw(c10398,4081) 10440,4081 SB8.2@10440,6315
  Bottom Layer w12: v1(12981.13,3110) v1(13430,3110)
  Bottom Layer w30: v1(10054,3685.73) v1(10054,4254) ; v1(10198,3685.73) v1(10198,3767.73) 10198,4103.96 cw(c10248.05,4103.96) 10248.05,4154.01 v1(11074.76,4154.01)
  other v1: 12489,3110 12587.43,3110 12685.85,3110 12784.28,3110 12882.7,3110 11112,3685.73 11230,3685.73 10054,3767.73 11112,3767.73 11230,3767.73 14954.15,4581 15010.15,4581 15058,4581 14954.15,4637 15010.15,4637 15058,4637 14954.15,4693 15010.15,4693 15058,4693 14748.61,6774.49 14787.98,6774.49 14824.08,6774.49 14748.61,6809.71 14787.98,6809.71 14824.08,6809.71
5V-LED: C128.2 C129.2 J18.3 L3.2 P16.1 R74.1 U30.1 | length 696.3
  Top Layer w10: U30.1@14421.97,4429.64 14425.95,4429.64 U30.1@14428.6,4427
  Top Layer w15: J18.3@11971.18,6840.28 12035.35,6776.12 cw(c11806.62,6547.52) 12130,6547.41 R74.1@12130,6337.63 ; 14717.97,4825.09 P16.1@14717.97,4907
  Top Layer w30: v1(14370,4430) 14421.62,4430 U30.1@14421.97,4429.64